# Altium PCB AnalogProject_PCBDoc.PcbDoc
Units mil, origin at the board's own origin, x right, y up, seen from the top; angles counter-clockwise.
Board outline 2357.65 x 1577.53 mil, 2 copper layers (Top Layer, Bottom Layer); 20 components, 11 nets, 48 pads, 3 vias.
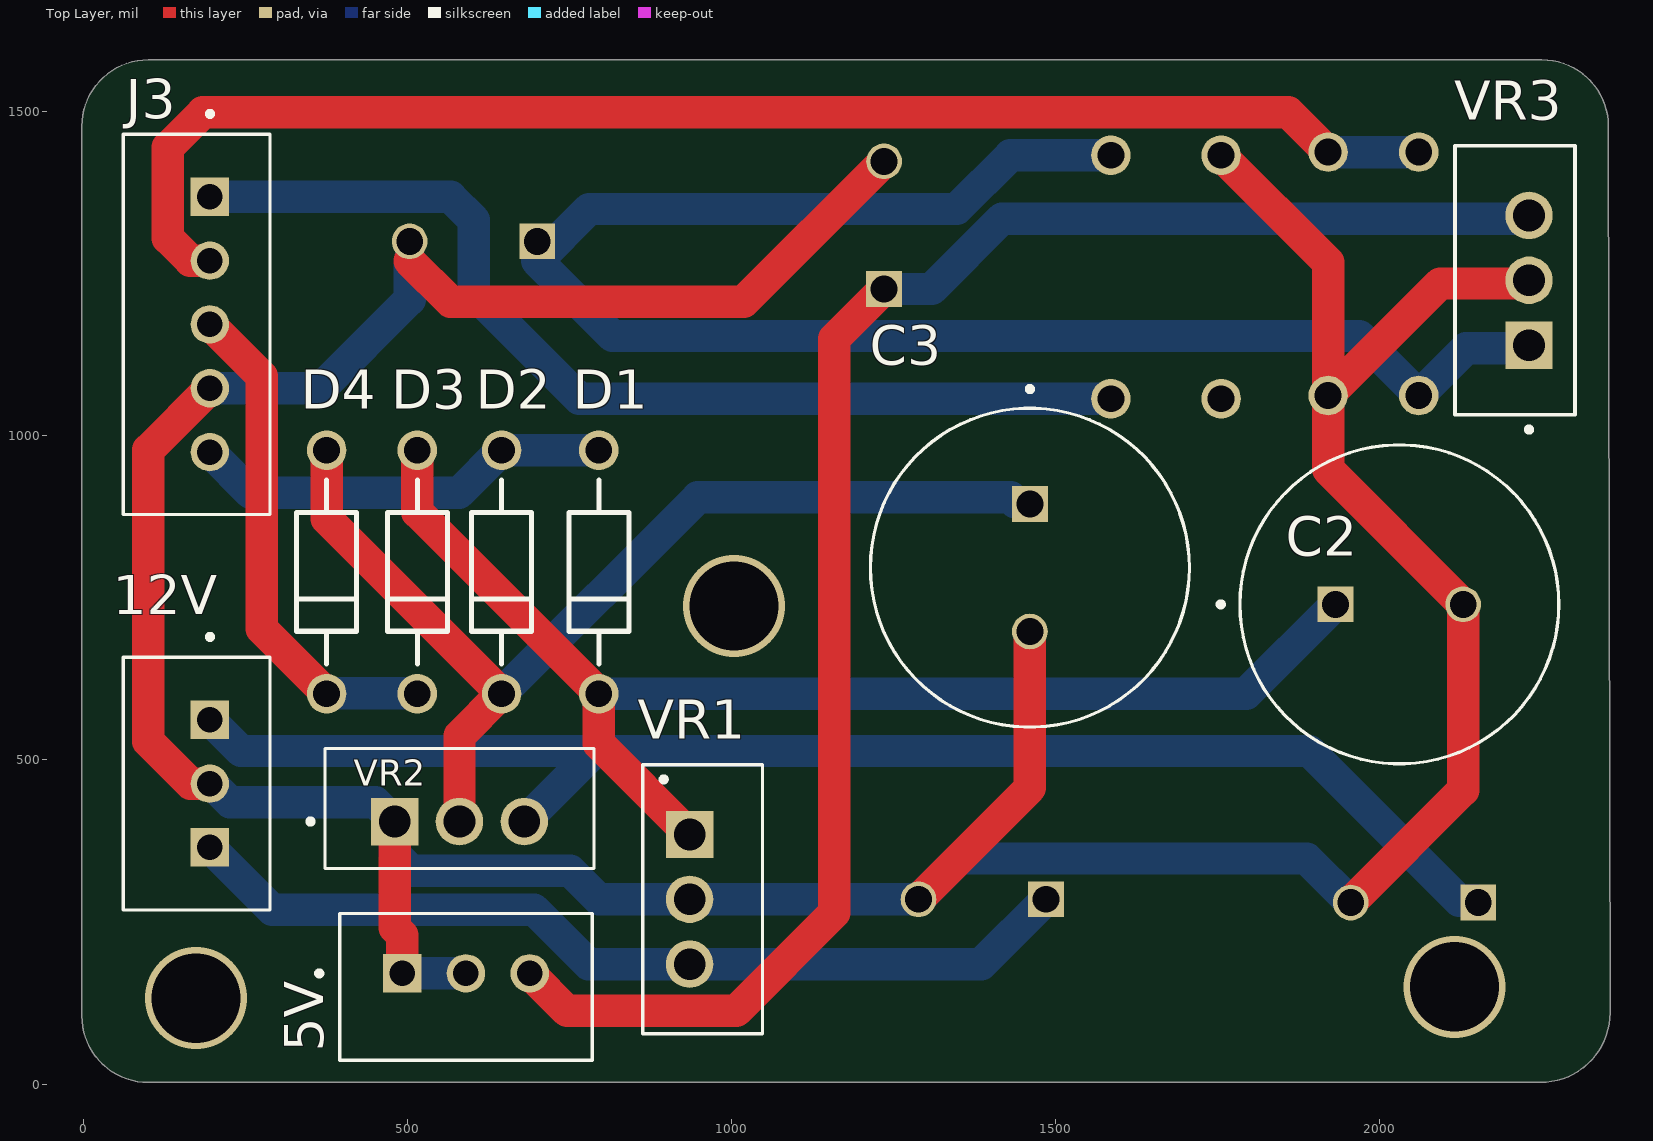
[diagram p0: Top Layer view]
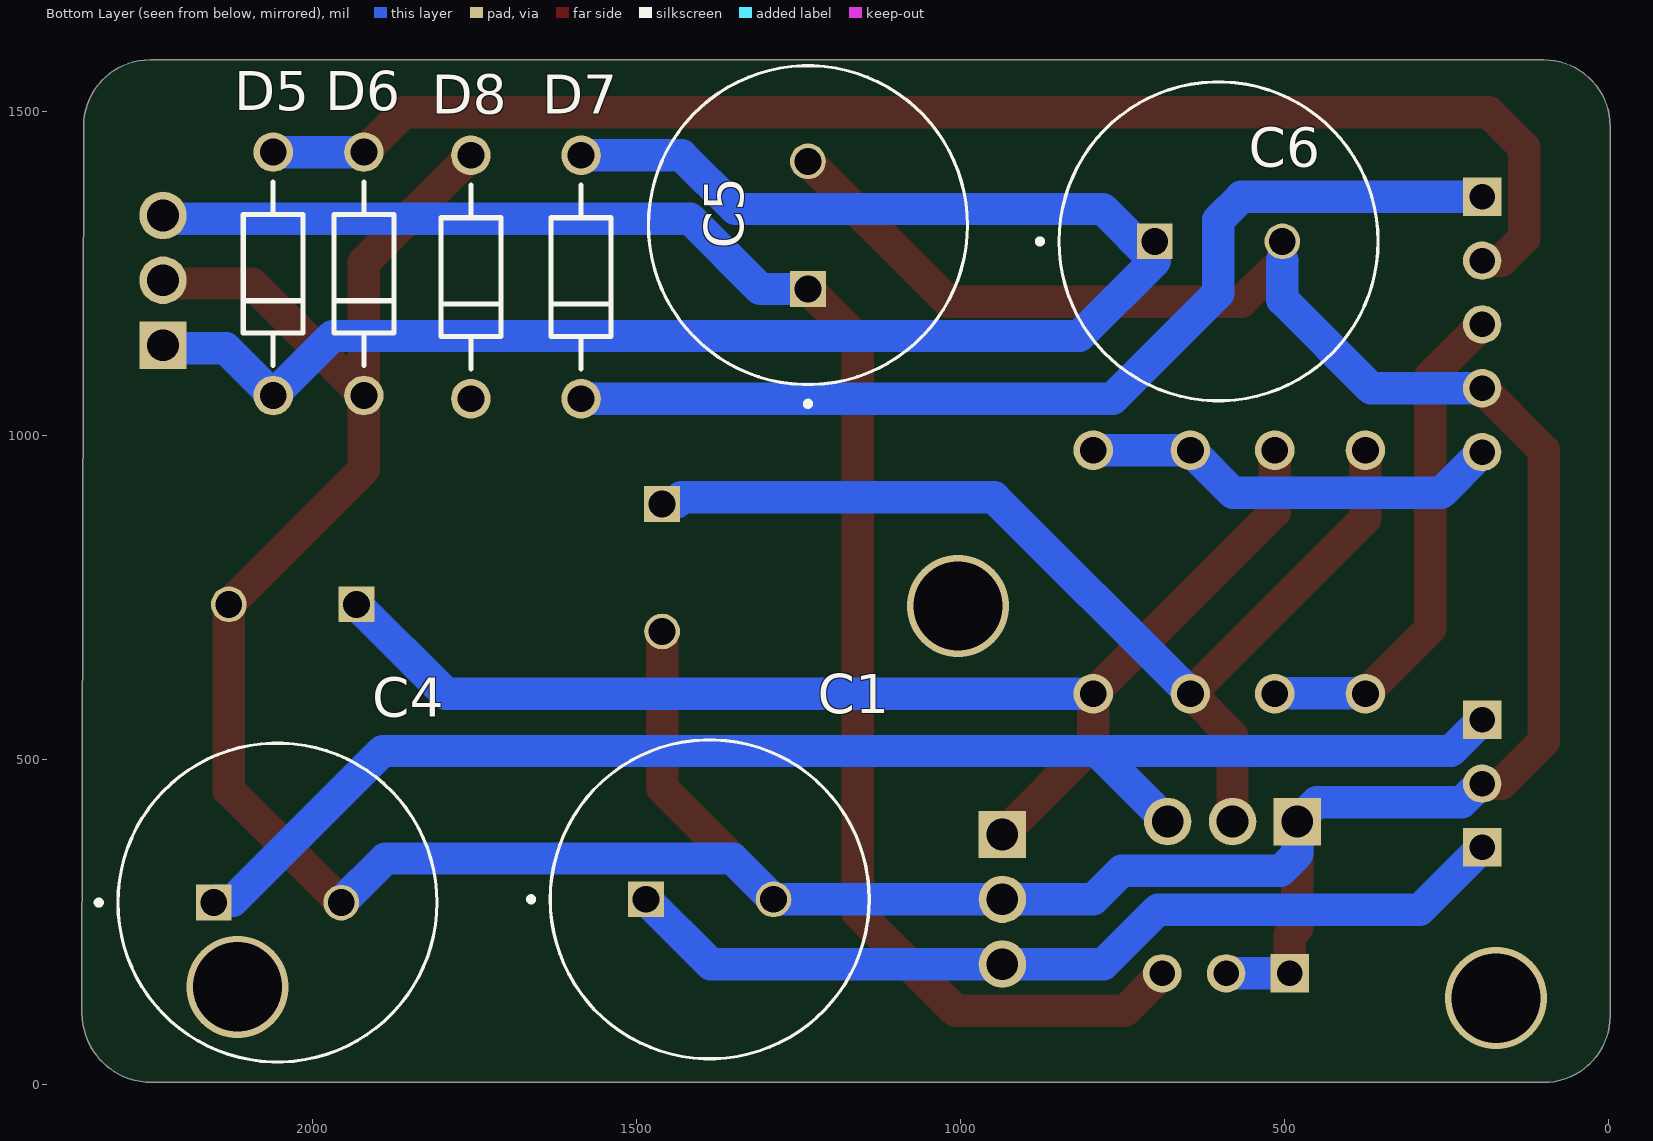
[diagram p1: Bottom Layer view, seen from below]
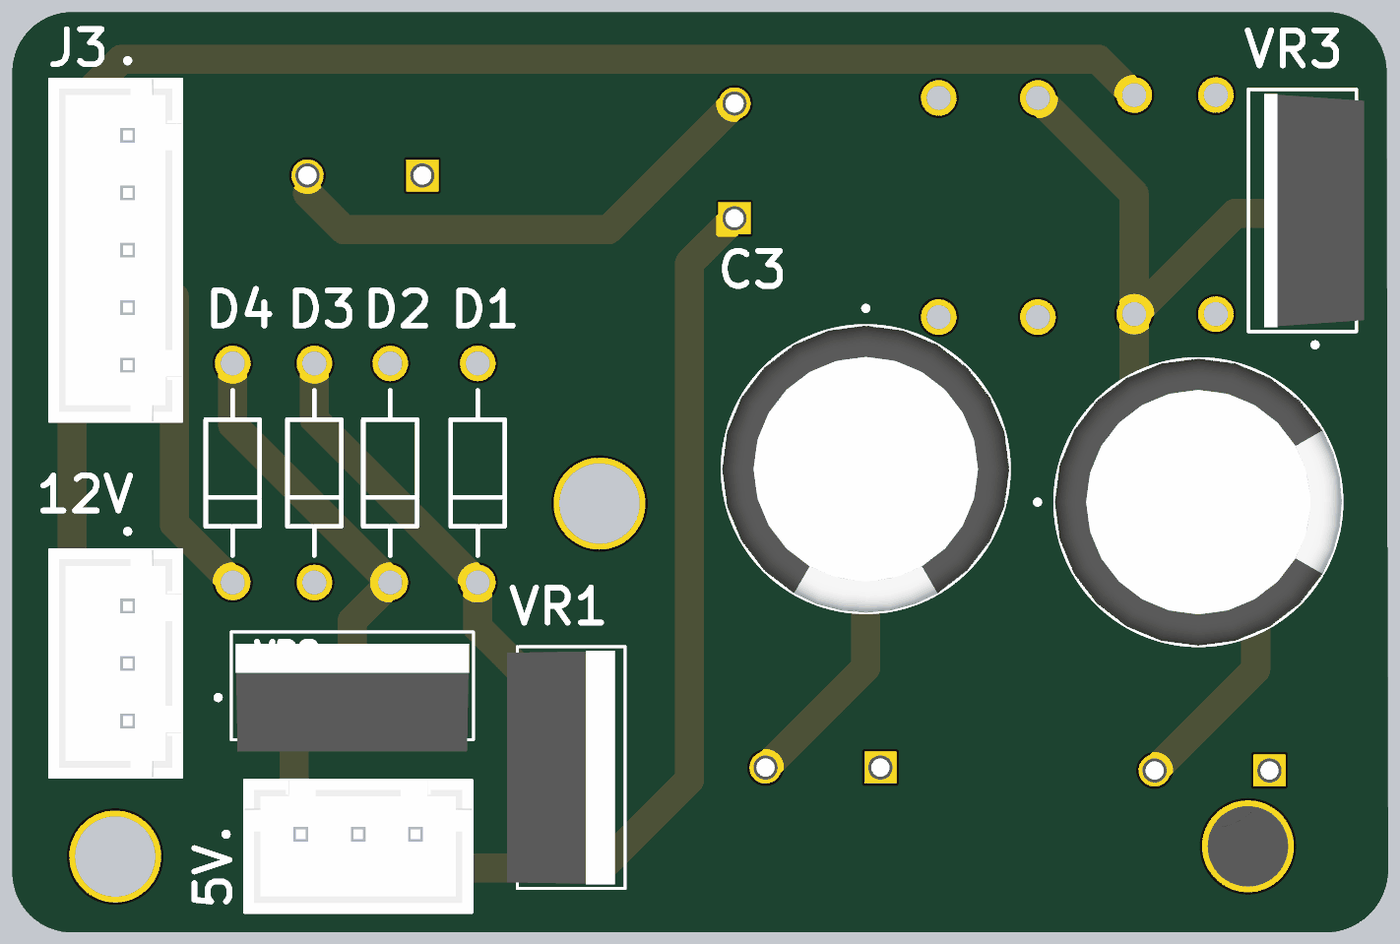
[diagram p2: 3D render of the assembled board from above, using the file's embedded part models]
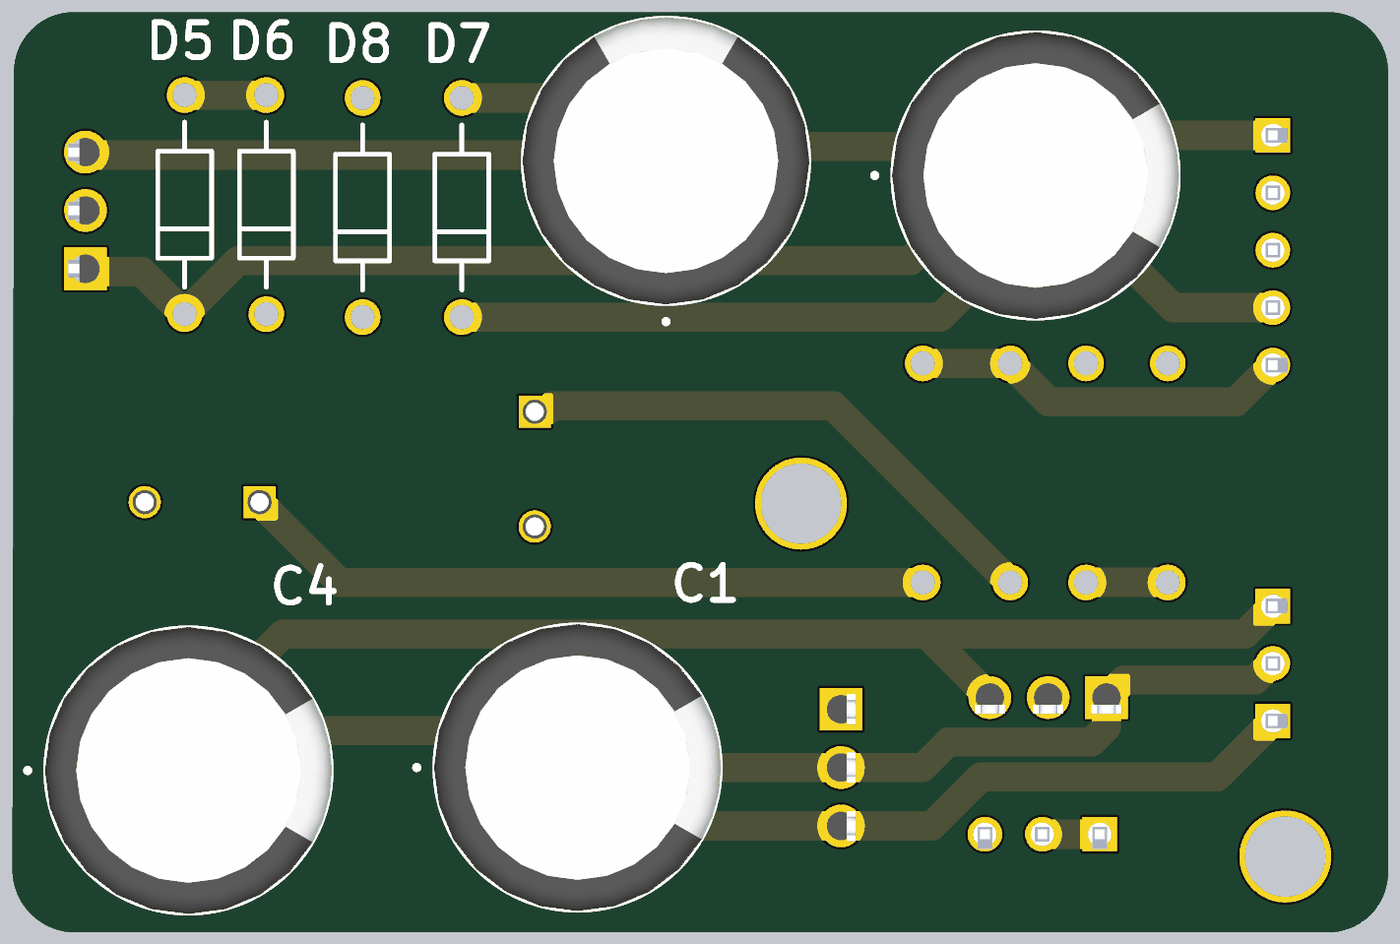
[diagram p3: 3D render of the assembled board from below, using the file's embedded part models]

## Layer stack, top to bottom
Top Solder: solder mask 0.4, Solder Resist, Dk 3.5
Top Layer: signal copper 1.4
Dielectric 1: dielectric 12.6, FR-4, Dk 4.8
Bottom Layer: signal copper 1.4
Bottom Solder: solder mask 0.4, Solder Resist, Dk 3.5

## Board outline
-2.53,105 ccw(c100,105) 100,2.47 2247.47,2.47 ccw(c2247.47,110.12) 2355.12,110.12 2352.53,1477.47 ccw(c2250,1477.47) 2250,1580 100,1580 ccw(c100,1477.47) -2.53,1477.47

## Design rules (kind name [scope] priority, off if disabled: settings)
Clearance [All] p1: gap=10 ignorepadtopadclearanceinfootprint=FALSE
Height [All] p1: minheight=0 maxheight=2362.2 prefheight=500
PolygonConnect [All] p1: connectstyle=Relief reliefconductorwidth=10 reliefentries=4 polygonreliefangle="90 Angle" airgapwidth=10
RoutingVias [All] p1: holewidth=28 width=50 viastyle="Through Hole" minholewidth=28 minwidth=50 maxholewidth=28 maxwidth=50
SolderMaskExpansion [All] p1: expansion=4 istentingtop=FALSE
SupplyNets "Schematic Supply Nets" [InNet('GND')] p1: voltage=0.000
Width [All] p1: maxlimit=60 minlimit=30 preferedwidth=50
29 further rules are at their usual default settings.

## Components (designator, comment, footprint, x,y, rotation, side; value= is the part's Value field where it differs from the comment)
5V "+" JST_B3B-XH-A#1 590,150 r180 top (schematic designator J1)
12V "+" JST_B3B-XH-A#2 174.33,463.43 r90 top (schematic designator J2)
C1 "2200uF Cap" "2200uF Cap" 1386.57,285 r180 bottom
C2 "2200uF Cap" "2200uF Cap" 2030,740 r0 top
C3 "2200uF Cap" "2200uF Cap" 1460,796.57 r270 top
C4 "2200uF Cap" "2200uF Cap" 2053.43,280 r180 bottom
C5 "2200uF Cap" "2200uF Cap" 1235,1325 r90 bottom
C6 "2200uF Cap" "2200uF Cap" 601.57,1300 r180 bottom
D1 "1N4001G" 1N4001_diode 795,790 r90 top
D2 "1N4001G" 1N4001_diode 645,790 r90 top
D3 "1N4001G" 1N4001_diode 515,790 r90 top
D4 "1N4001G" 1N4001_diode 375,790 r90 top
D5 "1N4001G" 1N4001_diode 2060,1250 r90 bottom
D6 "1N4001G" 1N4001_diode 1920,1250 r90 bottom
D7 "1N4001G" 1N4001_diode 1585,1245 r90 bottom
D8 "1N4001G" 1N4001_diode 1755,1245 r90 bottom
J3 "B5B-XH-A" JST_B5B-XH-A 174.33,1171.85 r90 top
VR1 "LM7812CT/NOPB" LM7812 935,285 r270 top
VR2 "LM7912CT/NOPB" LM7912 580,405 r0 top
VR3 "LM7805CT/NOPB" LM7805 2230,1140 r90 top

## Footprints (in the part's own frame and the unit in brackets; to place one, negate y for a bottom-side part, rotate by r counter-clockwise, add the part's x,y. Pads: shape width x height; smd on the part's side, far side on the other; paste and mask are expansions set on the pad)
1N4001_diode [mm] "AXIAL, 2-Leads, Diameter 2.35mm"
  round 1.55 hole 1.05: 1(-4.77,0) 2(4.77,0)
  silkscreen extent -3.6,-1.18 3.6,1.18
"2200uF Cap" [mm]
  rect 1.4x1.4 hole 1.05: 1(-2.5,0)
  round 1.4 hole 1.05: 2(2.5,0)
  silkscreen extent -7.1,-6.25 6.25,6.25, body extent -6.22,-6.25 6.25,6.25, height 35
JST_B3B-XH-A#1 [mm]
  rect 1.508x1.508 / inner round 1.508 / far side rect 1.508x1.508 hole 1: 1(2.5,-0.525)
  round 1.508 hole 1: 2(0,-0.525) 3(-2.5,-0.525)
  silkscreen extent -4.95,-2.88 5.85,2.87, body extent -4.95,-2.88 4.95,2.88, height 7
JST_B3B-XH-A#2 [mm]
  rect 1.508x1.508 / inner round 1.508 / far side rect 1.508x1.508 hole 1: 1(2.5,-0.525)
  round 1.508 hole 1: 2(0,-0.525)
  rect 1.508x1.508 hole 1: 3(-2.5,-0.525)
  silkscreen extent -4.95,-2.88 5.85,2.87, body extent -4.95,-2.88 4.95,2.88, height 7
JST_B5B-XH-A [mm]
  rect 1.508x1.508 / inner round 1.508 / far side rect 1.508x1.508 hole 1: 1(5,-0.525)
  round 1.508 hole 1: 2(2.5,-0.525) 3(0,-0.525) 4(-2.5,-0.525) 5(-5,-0.525)
  silkscreen extent -7.45,-2.88 8.35,2.87, body extent -7.45,-2.88 7.45,2.88, height 7
LM7805 [mm]
  rect 1.86x1.86 / inner round 1.86 / far side rect 1.86x1.86 hole 1.24: 1(0,0)
  round 1.86 hole 1.24: 2(2.54,0) 3(5.08,0)
  silkscreen extent -3.41,-1.8 7.81,2.9, body extent -2.54,-2.14 7.62,2.21, height 20.4
LM7812 [mm]
  rect 1.86x1.86 / inner round 1.86 / far side rect 1.86x1.86 hole 1.24: 1(-2.54,0)
  round 1.86 hole 1.24: 2(0,0) 3(2.54,0)
  silkscreen extent -5.27,-1.84 5.27,2.86, body extent -5.08,-2.29 5.08,2.41, height 15.49
LM7912 [mm]
  rect 1.86x1.86 / inner round 1.86 / far side rect 1.86x1.86 hole 1.24: 1(-2.54,0)
  round 1.86 hole 1.24: 2(0,0) 3(2.54,0)
  silkscreen extent -5.94,-1.84 5.27,2.86, body extent -5.08,-2.35 5.08,2.35, height 15.49

## Part data
5V 12V: library part B3B-XH-A, "Connector Header Through Hole 3 position 0.098 (2.50mm)", Package=None, Check_prices=https://www.snapeda.com/parts/B3B-XH-A/JST+Sales+America+Inc./view-part/?ref=eda, MF="JST Sales", MP=B3B-XH-A, SnapEDA_Link=https://www.snapeda.com/parts/B3B-XH-A/JST+Sales+America+Inc./view-part/?ref=snap
C1 C2 C3 C4 C5 C6: "2200 ÂµF 25 V Aluminum Electrolytic Capacitors Radial, Can - 5000 Hrs @ 105Â°C", Package="RADIAL-2 Panasonic", Availability="In Stock", Check_prices=https://www.snapeda.com/parts/EEUFC1E222/Panasonic/view-part/?ref=eda, MF=Panasonic, MP=EEUFC1E222, Price=None, SnapEDA_Link=https://www.snapeda.com/parts/EEUFC1E222/Panasonic/view-part/?ref=snap
D1 D2 D3 D4 D5 D6 D7 D8: library part CMP-0902-00120-1, "Diode, Rectifier, Standard, Vr 50V, If 1A, Pkg SOD57, Vf 0.93V, Tj +175C, Cs 30A, Ir 1UA", Average Rectified Current=1A, Breakdown Voltage=50V, Forward Voltage=1.1V, Manufacturer="On Semiconductor", Manufacturer Lifecycle Status=ACTIVE, Max Forward Surge Current (Ifsm)=30A, Max Operating Temperature=150°C, Min Operating Temperature=-65°C, Peak Reverse Current=10µA, Supplier Part Number=1N4001GOS-ND, Category="Rectifier Diodes", China RoHS=Non-Compliant, ComponentLink1Description="Manufacturer URL", ComponentLink1URL=http://www.onsemi.com/, ComponentLink2Description=Datasheet, ComponentLink2URL=http://www.onsemi.com/pub_link/Collateral/1N4001-D.PDF, ComponentLink3Description="Package Specification", ComponentLink3URL=http://www.onsemi.cn/pub_link/Collateral/59-10.PDF, ComponentLink4Description=https://datasheet.octopart.com:443/1N4001G-onsemi-datasheet-180957166.pdf?src-supplier=IHS, ComponentLink4URL=https://datasheet.octopart.com:443/1N4001G-onsemi-datasheet-180957166.pdf?src-supplier=IHS, ComponentLink5Description=https://datasheet.octopart.com:443/1N4001G-ON-Semiconductor-datasheet-12530915.pdf?src-supplier=TME, ComponentLink5URL=https://datasheet.octopart.com:443/1N4001G-ON-Semiconductor-datasheet-12530915.pdf?src-supplier=TME, ComponentLink6Description=https://datasheet.octopart.com:443/1N4001G-ON-Semiconductor-datasheet-642969.pdf?src-supplier=Newark, ComponentLink6URL=https://datasheet.octopart.com:443/1N4001G-ON-Semiconductor-datasheet-642969.pdf?src-supplier=Newark, ComponentLink7Description=https://datasheet.octopart.com:443/1N4001G-ON-Semiconductor-datasheet-120079161.pdf?src-supplier=Electro+Sonic, ComponentLink7URL=https://datasheet.octopart.com:443/1N4001G-ON-Semiconductor-datasheet-120079161.pdf?src-supplier=Electro+Sonic, ComponentLink8Description=https://datasheet.octopart.com:443/1N4001G-onsemi-datasheet-169408229.pdf?src-supplier=Farnell, ComponentLink8URL=https://datasheet.octopart.com:443/1N4001G-onsemi-datasheet-169408229.pdf?src-supplier=Farnell, ComponentLink9Description=https://datasheet.octopart.com:443/1N4001G-ON-Semiconductor-datasheet-7627526.pdf?src-supplier=Farnell, ComponentLink9URL=https://datasheet.octopart.com:443/1N4001G-ON-Semiconductor-datasheet-7627526.pdf?src-supplier=Farnell, ComponentLink10Description=https://datasheet.octopart.com:443/1N4001G-onsemi-datasheet-189127465.pdf?src-supplier=Master+Electronics, ComponentLink10URL=https://datasheet.octopart.com:443/1N4001G-onsemi-datasheet-189127465.pdf?src-supplier=Master+Electronics, ComponentLink11Description=https://datasheet.octopart.com:443/1N4001G-ON-Semiconductor-datasheet-9575991.pdf?src-supplier=RS+(Formerly+Allied+Electronics), ComponentLink11URL=https://datasheet.octopart.com:443/1N4001G-ON-Semiconductor-datasheet-9575991.pdf?src-supplier=RS+(Formerly+Allied+Electronics), ComponentLink12Description=https://datasheet.octopart.com:443/1N4001G-ON-Semiconductor-datasheet-14055278.pdf?src-supplier=iiiC, ComponentLink12URL=https://datasheet.octopart.com:443/1N4001G-ON-Semiconductor-datasheet-14055278.pdf?src-supplier=iiiC, ComponentLink13Description=http://sigma.octopart.com:80/15540786/rohs_certificate/ON-Semiconductor-1N4001G.pdf?src-supplier=Compliance+Statements, ComponentLink13URL=http://sigma.octopart.com:80/15540786/rohs_certificate/ON-Semiconductor-1N4001G.pdf?src-supplier=Compliance+Statements, ComponentLink14Description=http://sigma.octopart.com:80/15672877/materials_sheet/ON-Semiconductor-1N4001G.csv?src-supplier=Compliance+Statements, ComponentLink14URL=http://sigma.octopart.com:80/15672877/materials_sheet/ON-Semiconductor-1N4001G.csv?src-supplier=Compliance+Statements, ComponentLink15Description=http://sigma.octopart.com:80/150599183/rohs_statement/ON-Semiconductor-1N4001G.pdf?src-supplier=Compliance+Statements, ComponentLink15URL=http://sigma.octopart.com:80/150599183/rohs_statement/ON-Semiconductor-1N4001G.pdf?src-supplier=Compliance+Statements, ComponentLink16Description=http://sigma.octopart.com:80/reach_statement/ON-Semiconductor-company-79.pdf?src-supplier=Compliance+Statements, ComponentLink16URL=http://sigma.octopart.com:80/reach_statement/ON-Semiconductor-company-79.pdf?src-supplier=Compliance+Statements, ComponentLink17Description=http://sigma.octopart.com:80/reach_statement/Fairchild-Semiconductor-company-9.pdf?src-supplier=Compliance+Statements, ComponentLink17URL=http://sigma.octopart.com:80/reach_statement/Fairchild-Semiconductor-company-9.pdf?src-supplier=Compliance+Statements, ComponentLink18Description=http://sigma.octopart.com:80/rohs_statement/Fairchild-Semiconductor-company-10.pdf?src-supplier=Compliance+Statements, ComponentLink18URL=http://sigma.octopart.com:80/rohs_statement/Fairchild-Semiconductor-company-10.pdf?src-supplier=Compliance+Statements, ComponentLink19Description=http://sigma.octopart.com:80/rohs_statement/Fairchild-Semiconductor-company-11.pdf?src-supplier=Compliance+Statements, ComponentLink19URL=http://sigma.octopart.com:80/rohs_statement/Fairchild-Semiconductor-company-11.pdf?src-supplier=Compliance+Statements, ComponentLink20Description=https://octopart.com:443/opatz8j6/c1?t=Btc9yGr2Y6o3Pwa-u9IBNKBFOyXQsxSPzEp4tg1RnPN713PaLfwQ1VfuA_XWUtxZRoPEkwrRKtNU5uHmE9a_mhTqVQTtSywZFs8RaIGslnhFNPFr0p--yrxVyK_45oNWJt5JSFmwDU9d0CfUqhMTwTunA-l-EiNiIFdD3010omeyugU4VABW7IUkzIZBO9zKDN8M65PIbE-UaUrn33F7C4G05qz9fywyIsOWlUx2CANabjtnz7BcYWIZxYz_gNHThvESJfauwUU2t5ONFD2VpZoaqptG4I_ZAR9eGyvho77mnZZKzNh8uTO_hCoLFf0wHUbJxZDoQtu7_HsXZHzHAZZSUEaf&src-supplier=Compliance+Statements, ComponentLink20URL=https://octopart.com:443/opatz8j6/c1?t=Btc9yGr2Y6o3Pwa-u9IBNKBFOyXQsxSPzEp4tg1RnPN713PaLfwQ1VfuA_XWUtxZRoPEkwrRKtNU5uHmE9a_mhTqVQTtSywZFs8RaIGslnhFNPFr0p--yrxVyK_45oNWJt5JSFmwDU9d0CfUqhMTwTunA-l-EiNiIFdD3010omeyugU4VABW7IUkzIZBO9zKDN8M65PIbE-UaUrn33F7C4G05qz9fywyIsOWlUx2CANabjtnz7BcYWIZxYz_gNHThvESJfauwUU2t5ONFD2VpZoaqptG4I_ZAR9eGyvho77mnZZKzNh8uTO_hCoLFf0wHUbJxZDoQtu7_HsXZHzHAZZSUEaf&src-supplier=Compliance+Statements, ComponentLink21Description=https://octopart.com:443/opatz8j6/c1?t=ZzknCHRg1eQ0pBumD0smVZiDD7l0WIJxyB-GReAyKIHHXvCoGAl7N6KvvitfTZ_kS-BuwgVwGktFAqT5Etjfm8z2MrpD0Fv5hVeeNCfyR7K2vu65XlwxpbxnTacAWLjZtMJFE1XAOFuxxtViVIl_jxY3RjVJGecmGYptHNuJW5NI0GyIxNheSVEtQFEenhuBhf59cl8P4cyOuCw4Pf1ydSMw8_ZXmVQ88EklmMBxhbsjO7mxbuhQFU_aFJa2MGHq9Eu8gG2EezbstrSIdlyA2U2Z4qw-72lL76f98V4UigxNRMaaLpiadmiStbOc-D-VGSnr_fOP9dgx445bnGN4BWdDdQZTGA&src-supplier=Compliance+Statements, ComponentLink21URL=https://octopart.com:443/opatz8j6/c1?t=ZzknCHRg1eQ0pBumD0smVZiDD7l0WIJxyB-GReAyKIHHXvCoGAl7N6KvvitfTZ_kS-BuwgVwGktFAqT5Etjfm8z2MrpD0Fv5hVeeNCfyR7K2vu65XlwxpbxnTacAWLjZtMJFE1XAOFuxxtViVIl_jxY3RjVJGecmGYptHNuJW5NI0GyIxNheSVEtQFEenhuBhf59cl8P4cyOuCw4Pf1ydSMw8_ZXmVQ88EklmMBxhbsjO7mxbuhQFU_aFJa2MGHq9Eu8gG2EezbstrSIdlyA2U2Z4qw-72lL76f98V4UigxNRMaaLpiadmiStbOc-D-VGSnr_fOP9dgx445bnGN4BWdDdQZTGA&src-supplier=Compliance+Statements, Contact Plating=Tin, Current Rating=1A, DatasheetVersion="Rev. 13", Diameter=2.7mm, Element Configuration=Single, Forward Current=1A, Halogen Free="Halogen Free", Height=5.2mm, IFSM Max (A)=30, IO(rec) Max (A)=1, Lead Free="Lead Free", Length=5.1816mm, Lifecycle Status=Production, Manufacturer Part Number=1N4001G, Max Output current=1A, Max Repetitive Reverse Voltage (Vrrm)=50V, Max Reverse Voltage (DC)=50V, Max Surge Current=30A, Mounting Technology="Through Hole", Number of Elements=1, Number of Terminals=2, Output Current=1A, PackageDescription="2-Pin, Axial Lead, Diameter 2.35 mm", PackageReference=AXIAL_LEAD-2-59-10, PackageVersion="Rev. U, 02/2005", Packaging=Bulk, Packing="Bulk Bag", PartNumber=1N4001G, Peak Non-Repetitive Surge Current=30A, Pins=2, Polarity=Standard, Pricing="1=0.17, 10=0.11, 100=0.0958, 500=0.0703, 1000=0.05028, 2000=0.04862, 5000=0.04638, 10000=0.04282, 50000=0.03549 (USD)", Radiation Hardening=No, REACH SVHC=No, Reverse Standoff Voltage=50V, Reverse Voltage=50V, RoHS=TRUE, Schedule B="8541100080, 8541100080|8541100080, 8541100080|8541100080|8541100080, 8541100080|8541100080|8541100080|8541100080", Stock=18819, Supplier=DigiKey, Type="Standard Recovery", Voltage Rating (DC)=50V, VRRM Max (V)=50, Weight=4.535924g, Width=6.35mm
J3: "Connector Header Through Hole 5 position 0.098 (2.50mm)", Package=None, Check_prices=https://www.snapeda.com/parts/B5B-XH-A/JST+Sales+America+Inc./view-part/?ref=eda, MF="JST Sales", MP=B5B-XH-A, SnapEDA_Link=https://www.snapeda.com/parts/B5B-XH-A/JST+Sales+America+Inc./view-part/?ref=snap
VR1: "1.5-A, 30-V, linear voltage regulator", Package="TO-220-3 Texas Instruments", Check_prices=https://www.snapeda.com/parts/LM7812CT/NOPB/Texas+Instruments/view-part/?ref=eda, MF="Texas Instruments", MP=LM7812CT/NOPB, SnapEDA_Link=https://www.snapeda.com/parts/LM7812CT/NOPB/Texas+Instruments/view-part/?ref=snap
VR2: "1.5-A, negative linear voltage regulator", Package="TO-220-3 Texas Instruments", Check_prices=https://www.snapeda.com/parts/LM7912CT/NOPB/Texas+Instruments/view-part/?ref=eda, MF="Texas Instruments", MP=LM7912CT/NOPB, SnapEDA_Link=https://www.snapeda.com/parts/LM7912CT/NOPB/Texas+Instruments/view-part/?ref=snap
VR3: "Linear Voltage Regulator IC Positive Fixed 1 Output 1.5A TO-220-3", Package="TO-220-3 ON Semiconductor", Availability="In Stock", Check_prices=https://www.snapeda.com/parts/LM7805CT/Onsemi/view-part/?ref=eda, MF="ON Semiconductor", MP=LM7805CT, Price=None, Purchase-URL=https://pricing.snapeda.com/search/part/LM7805CT/?ref=eda, SnapEDA_Link=https://www.snapeda.com/parts/LM7805CT/Onsemi/view-part/?ref=snap

## Via types
v1: diameter 157.48, hole 137.8, Top Layer to Bottom Layer, 3 vias

## Nets (pads, with @x,y where several pads share a name; then routed paths per layer and width w, separated by ;. In a path a pad name is that pad's centre, name@x,y a point inside that pad or via, vN(x,y) a via of type N, cw(c..) or ccw(c..) an arc to the next point about the centre after c; other vN are vias at no path point)
5V: 5V.3 C5.1 VR3.3 | length 2592.5
  Top Layer w50: 5V.3 746.1,113 1007,113 1158,264 1158,1149.57 C5.1
  Bottom Layer w50: C5.1 1308.57,1226.57 1417,1335 2208.58,1335 2209.13,1335.56 2225.56,1335.56 VR3.3
+Vs: 12V.3 C1.1 VR1.3 | length 1406
  Bottom Layer w50: 12V.3 291,269 695,269 779,185 VR1.3 1385,185 C1.1
-Vs: 12V.1 C4.1 VR2.3 | length 2227.5
  Bottom Layer w50: 12V.1 243,513.85 788.85,513.85 ; VR2.3 788.85,513.85 ; C4.1 2149.29,282.56 2122.44,282.56 1891.15,513.85 788.85,513.85
GND: 5V.1 5V.2 12V.2 C1.2 C2.2 C3.2 C4.2 C5.2 C6.2 D6.1 D8.2 J3.4 VR1.2 VR2.1 VR3.2 | length 6480.8
  Top Layer w50: 12V.2 165,463.43 100,528.43 100,978.43 J3.4 ; VR2.1 480,241.39 491.57,229.82 5V.1 ; 503.15,1270 566.15,1207 1018.57,1207 C5.2 ; C1.2 1460,456.85 C3.2 ; D8.2 1920,1267.8 D6.1 ; C4.2 2128.43,453.43 C2.2 1920,948.43 D6.1 ; VR3.2 2225.56,1235.56 2209.13,1235.56 2208.58,1235 2092.8,1235 D6.1
  Bottom Layer w50: 12V.2 197.54,463.43 225.96,435 450,435 VR2.1 480,355 506,329 751,329 795,285 VR1.2 C1.2 1351.15,348 1887,348 C4.2 ; J3.4 366.43,1073.43 503.15,1210.15 503.15,1270 ; 5V.1 5V.2
NetC2_1: C2.1 D1.1 D3.2 VR1.1 | length 1960.4
  Top Layer w50: D3.2 515,882.2 D1.1 795,525 VR1.1
  Bottom Layer w50: D1.1 1793.78,602.2 C2.1
NetC3_1: C3.1 D2.1 D4.2 VR2.2 | length 1656.1
  Top Layer w50: D4.2 375,872.2 D2.1 580,537.2 VR2.2
  Bottom Layer w50: D2.1 947.8,905 1430.24,905 1437.68,897.56 1457.44,897.56 C3.1
NetC6_1: C6.1 D5.1 D7.2 VR3.1 | length 2600.7
  Bottom Layer w50: D7.2 1429.8,1432.8 1347.01,1350 780,1350 700,1270 816,1154 1968.2,1154 D5.1 2132.8,1135 2225,1135 VR3.1
NetD1_2: D1.2 D2.2 J3.5 | length 653.3
  Bottom Layer w50: J3.5 258,912 579.2,912 D2.2 D1.2
NetD3_1: D3.1 D4.1 J3.3 | length 784.5
  Top Layer w50: J3.3 275,1091.85 275,702.2 D4.1
  Bottom Layer w50: D4.1 375.38,602.59 514.62,602.59 D3.1
NetD5_2: D5.2 D6.2 J3.2 | length 2197.1
  Top Layer w50: J3.2 164.72,1270.28 130,1305 130,1445 184,1499 1858.8,1499 D6.2
  Bottom Layer w50: D6.2 D5.2
NetD7_1: D7.1 J3.1 | length 1585.1
  Bottom Layer w50: J3.1 566.3,1368.7 602,1333 602,1220.2 765,1057.2 D7.1
pads on no net: D8.1
copper on no net:
  other v1: 173.63,132.51 2115,150 1003.63,737.51

## Silkscreen, mask and mechanical layers (free items; w line width, h text height)
Mechanical 1:
  lines w10: -2.53,105 ccw(c100,105) 100,2.47 2247.47,2.47 ccw(c2247.47,110.12) 2355.12,110.12 2352.53,1477.47 ccw(c2250,1477.47) 2250,1580 2200,1580 100,1580 ccw(c100,1477.47) -2.53,1477.47 -2.53,105